# Allegro board LAY_90818_C.brd
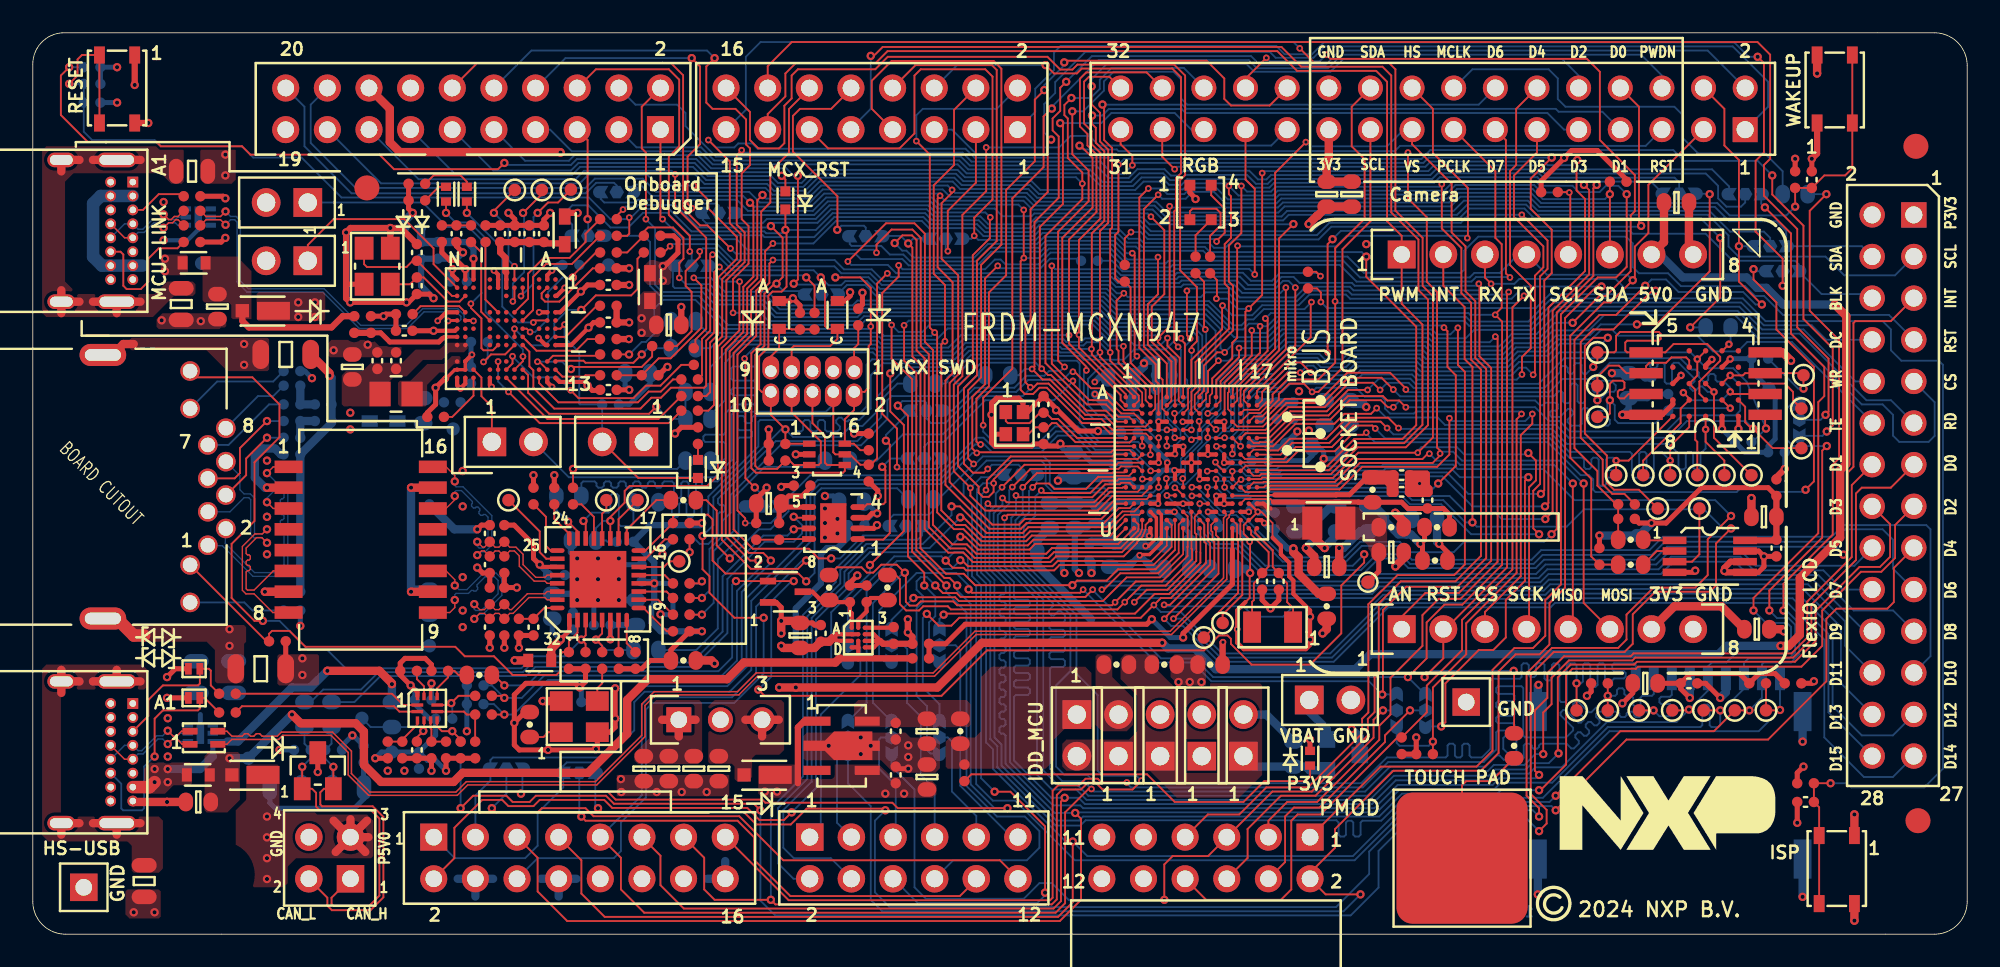
[diagram p0: board, top side]
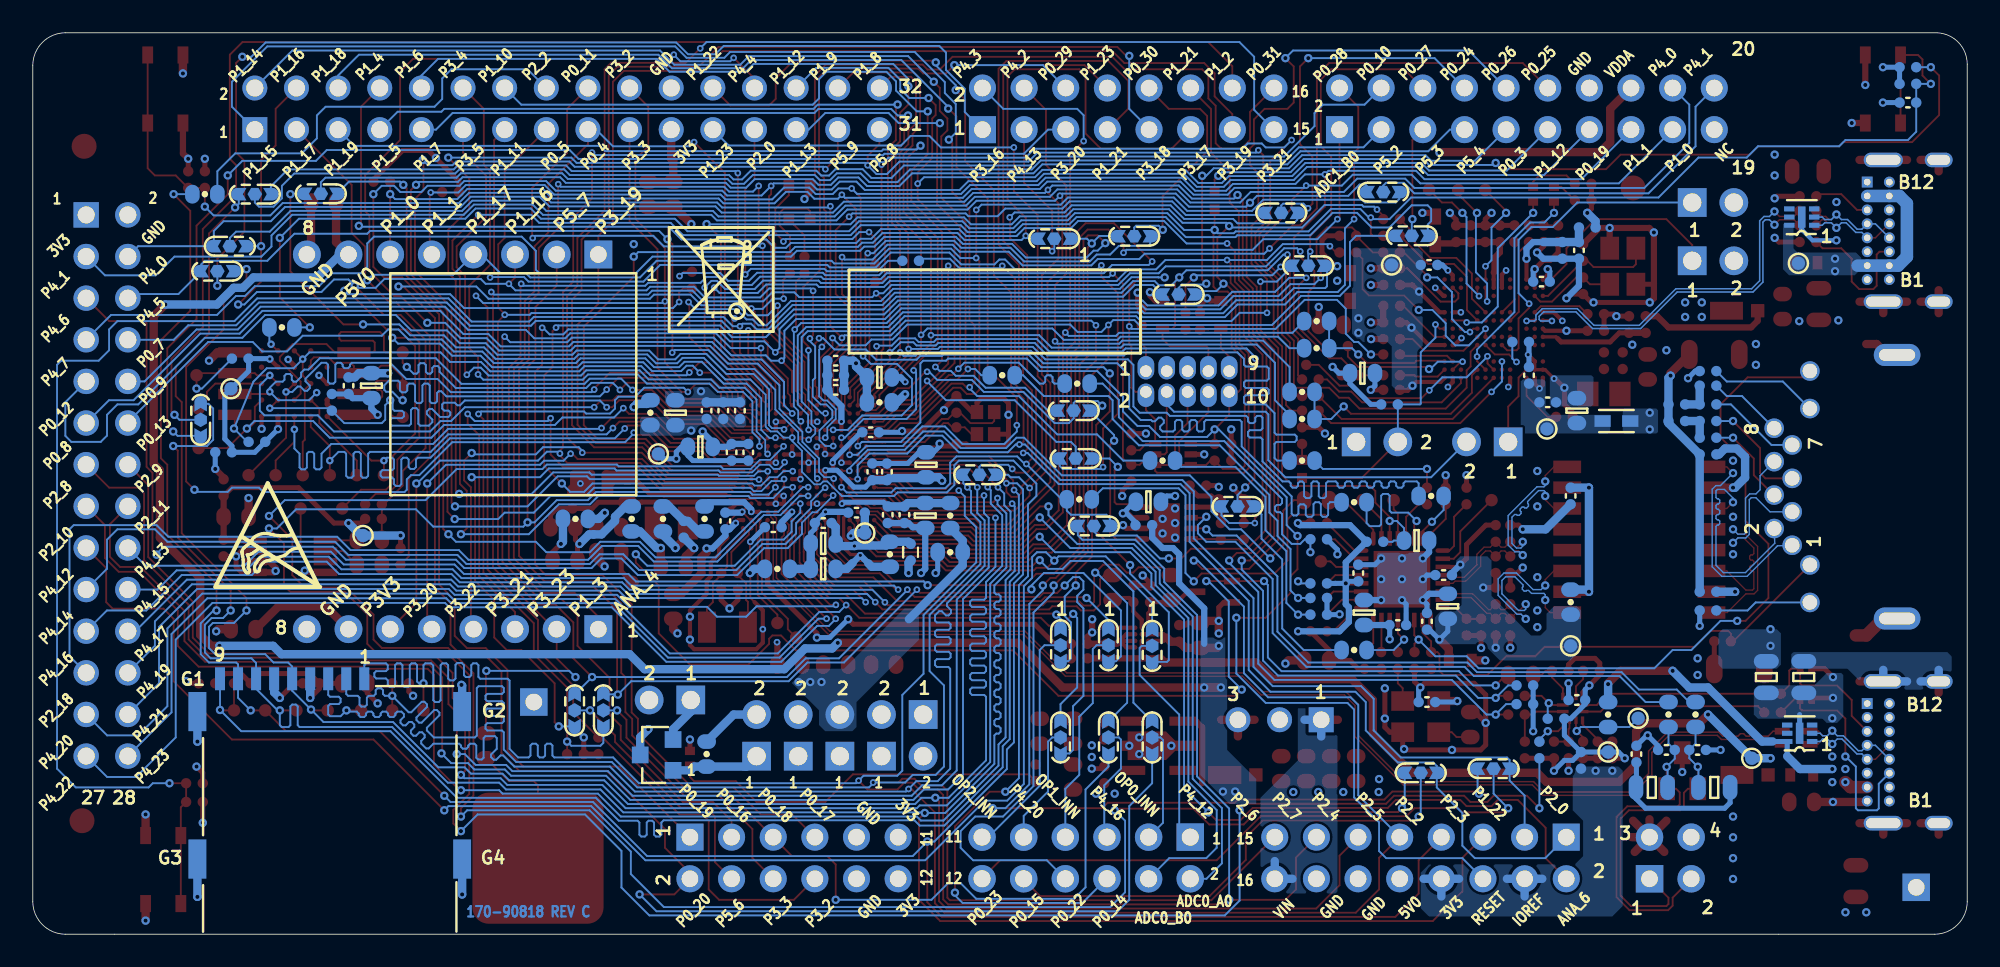
[diagram p1: board, bottom side, seen from below]

Outline 118 x 55 mm; copper layers: TOP, GND, POWER, BOTTOM. Coordinates in mm from the lower left corner of the outline.
Outline path: 0,53.08 0,2 arc(0.59,0.59) 2,0 116,0 arc(117.41,0.59) 118,2 118,53 arc(117.41,54.41) 116,55 1.84,55 arc(0.53,54.41) 0,53.08

## Design rules (mm)
constraint set DEFAULT: min track width 0.112, pair gap 0.112
net group DIFFPAIR2: nets HS_USB_DN HS_USB_DP
net group DIFFPAIR3: nets MCU_LINK_USB_DN MCU_LINK_USB_DP
net group DIFFPAIR4: nets ENET_CON_RXN ENET_CON_RXP
net group DIFFPAIR5: nets ENET_CON_TXN ENET_CON_TXP
net group DIFFPAIR6: nets LPC_USB1_DM LPC_USB1_DP
net group DIFFPAIR7: nets MCX_USB1_DM MCX_USB1_DP
net group ENET_PHYAD0: nets ENET_PHYAD0 N18326563
net group P1_6/ENET_TXD0: nets P1_6/ENET_TXD0 P1_6/SMARTDMA_LCD_D2_CAMERA_D2
net group P1_7/ENET_TXD1: nets P1_7/ENET_TXD1 P1_7/SMARTDMA_LCD_D3_CAMERA_D3
net group P1_4/ENET_TXCLK: nets N18327491 N18782104 P1_4/ENET_TXCLK
net group P1_5/ENET_TXEN: nets N18326577 P1_5/ENET_TXEN P1_5/SMARTDMA_LCD_D1_CAMERA_D1
net group P1_13/ENET_RXDV/MODE2: nets N18326622 P1_13/ENET_RXDV/MODE2 P1_13/SMARTDMA_LCD_D9
net group P1_14/ENET_RXD0/MODE0: nets N18326713 P1_14/ENET_RXD0/MODE0 P1_14/SMARTDMA_LCD_D10
net group P1_15/ENET_RXD1/MODE1: nets N18326681 P1_15/ENET_RXD1/MODE1 P1_15/SMARTDMA_LCD_D11

## Placement (name value [footprint] x y rotation side)
C1  4.7pF  [CC0402_25]  61.66 32.33 90 top
C2  4.7pF  [CC0402_25]  61.66 30.42 270 top
C3  0.1UF  [CC0402_25]  108.14 8.07 180 top
C4  0.1UF  [CC0402_25]  108.52 46.04 90 top
C5  0.1UF  [CC0402_25]  3.62 50.74 0 bottom
C6  1uF  [CC0603_OV]  78.8 31.82 90 bottom
C7  0.1UF  [CC0402_25]  76.9 31.94 90 bottom
C8  0.1UF  [CC0402_25]  75.88 31.94 90 bottom
C9  0.1UF  [CC0402_25]  74.87 31.94 90 bottom
C10  1uF  [CC0603_OV]  63.51 28.64 90 bottom
C11  0.1UF  [CC0402_25]  66.79 28.21 90 bottom
C12  0.1UF  [CC0402_25]  65.9 28.21 90 bottom
C13  1uF  [CC0603_OV]  66.36 33.98 180 bottom
C14  0.1UF  [CC0402_25]  69.02 34.1 0 bottom
C15  0.1UF  [CC0402_25]  69.02 33.21 0 bottom
C16  0.1UF  [CC0402_25]  69.02 34.99 0 bottom
C17  1uF  [CC0603_OV]  63.56 25.54 270 bottom
C18  0.1UF  [CC0402_25]  65.85 25.59 270 bottom
C19  0.1UF  [CC0402_25]  64.83 25.59 270 bottom
C20  0.1UF  [CC0402_25]  69.79 25.09 0 bottom
C21  4.7uF  [CC0603_OV]  77.28 29.74 180 bottom
C22  0.1UF  [CC0402_25]  75.37 29.4 90 bottom
C23  0.1UF  [CC0402_25]  74.36 29.4 90 bottom
C24  2.2UF  [CC0402_25]  83.5 28.01 0 top
C25  1uF  [CC0603_OV]  69.79 22.29 0 bottom
C26  0.22uF  [CC0402_25]  67.75 25.72 0 bottom
C27  6.8uF  [CC0603_OV]  82.87 23.31 0 top
C28  4.7uF  [CC0603_OV]  78.93 22.42 180 top
C29  0.1UF  [CC0402_25]  72.83 24.83 0 bottom
C30  0.1UF  [CC0402_25]  66.89 30.62 180 bottom
C31  0.1UF  [CC0402_25]  75.75 25.21 90 bottom
C32  0.1UF  [CC0402_25]  85.08 26.48 90 top
C33  4.7uF  [CC0603_OV]  54.55 9.59 90 top
C34  0.1UF  [CC0402_25]  52.64 9.72 90 top
C35  4.7uF  [CC0603_OV]  54.55 12.39 270 top
C36  0.1UF  [CC0402_25]  52.64 12.39 270 top
C37  10uF  [CC0603_OV]  46.8 18.23 90 top
C38  0.22uF  [CC0402_25]  48.07 18.36 90 top
C39  4.7uF  [CC0603_OV]  10.1 8.07 180 top
C40  0.22uF  [CC0402_25]  23.43 11.24 270 top
C41  0.22uF  [CC0402_25]  23.81 14.29 0 bottom
C42  1uF  [CC0603_OV]  98.36 15.31 180 top
C43  0.1UF  [CC0402_25]  101.03 15.31 0 top
C44  0.1UF  [CC0402_25]  106.36 23.56 270 top
C45  1uF  [CC0603_OV]  105.6 25.47 180 top
C46  1uF  [CC0603_OV]  97.34 33.47 90 bottom
C47  0.1UF  [CC0402_25]  98.74 33.47 90 bottom
C48  470pF  [CC0402_25]  34.73 18.86 180 bottom
C49  1uF  [CC0603_OV]  36.79 19.63 90 bottom
C50  22uF  [CC0603_OV]  31.69 20.01 90 bottom
C51  0.1UF  [CC0402_25]  32.96 19.09 90 bottom
C52  0.1UF  [CC0402_25]  31.94 21.91 0 bottom
C53  0.1UF  [CC0402_25]  37.15 22.04 90 bottom
C54  15pF  [CC0402_25]  27.88 22.55 270 top
C55  15pF  [CC0402_25]  27.88 24.45 90 top
C56  15pF  [CC0402_25]  27.88 18.74 270 top
C57  15pF  [CC0402_25]  27.88 20.64 90 top
C58  0.1UF  [CC0402_25]  32.96 14.16 0 bottom
C60  1000pF  [CC1206_OV]  13.91 16.2 0 top
C61  1000pF  [CC1206_OV]  15.43 35.37 180 top
C62  10uF  [CC0603_OV]  33.59 24.02 180 bottom
C63  100PF  [CC0402_25]  30.54 18.74 270 top
C64  1uF  [CC0603_OV]  44.89 26.28 180 top
C65  1uF  [CC0603_OV]  49.95 26.38 180 bottom
C66  56PF  [CC0402_25]  16.45 11.24 180 bottom
C67  0.01UF  [CC0402_25]  20.18 10.99 90 bottom
C68  56PF  [CC0402_25]  18.35 11.24 0 bottom
C69  10uF  [CC0603_OV]  69.79 23.84 0 bottom
C70  10uF  [CC0603_OV]  105.17 18.61 0 top
C71  10uF  [CC0603_OV]  100.27 44.64 0 top
C72  10uF  [CC0603_OV]  38.8 10.1 270 top
C73  10uF  [CC0603_OV]  40.32 10.1 270 top
C74  10uF  [CC0603_OV]  37.27 10.1 270 top
C75  10uF  [CC0603_OV]  41.85 10.1 270 top
C76  0.1UF  [CC0402_25]  35.11 39.61 0 top
C77  0.1UF  [CC0402_25]  35.11 33.21 0 top
C78  4.7uF  [CC0603_OV]  11.26 38.29 270 top
C79  0.1UF  [CC0402_25]  22.66 36.82 180 top
C80  0.1UF  [CC0402_25]  35.11 37.33 0 top
C81  0.1UF  [CC0402_25]  25.97 39.82 180 bottom
C82  0.1UF  [CC0402_25]  32.83 40.83 180 bottom
C83  10uF  [CC0603_OV]  36.89 34.23 180 bottom
C84  10uF  [CC0603_OV]  38.8 37.18 0 top
C85  0.1UF  [CC0402_25]  25.84 42.74 270 top
C86  0.1UF  [CC0402_25]  30.29 42.74 90 top
C87  47PF  [CC0402_25]  29.4 42.74 90 top
C88  0.1UF  [CC0402_25]  28.51 42.74 90 top
C89  47PF  [CC0402_25]  31.18 42.74 90 top
C90  22uF  [CC0603_OV]  19.49 34.61 90 top
C91  0.1UF  [CC0402_25]  21.02 34.99 90 top
C92  47PF  [CC0402_25]  22.16 34.99 90 top
C93  22uF  [CC0603_OV]  23.81 31.94 90 bottom
C94  0.1UF  [CC0402_25]  26.73 34.1 90 bottom
C95  47PF  [CC0402_25]  25.59 32.45 180 bottom
C96  12PF  [CC0402_25]  23.43 39.56 270 top
C97  12PF  [CC0402_25]  23.43 41.6 90 top
C99  0.1UF  [CC0402_25]  24.19 26.74 270 bottom
C100  4.7pF  [CC0402_25]  74.99 21.53 270 top
C101  4.7pF  [CC0402_25]  76.01 21.53 270 top
C102  0.01UF  [CC0805_OV]  6.79 3.24 90 top
C103  0.01UF  [CC0805_OV]  9.05 38.45 90 top
C104  10uF  [CC0603_OV]  78.93 45.15 270 top
C105  10uF  [CC0603_OV]  80.45 45.15 270 top
C106  0.1UF  [CC0402_25]  23.68 41.72 270 bottom
C107  0.1UF  [CC0402_25]  83.5 26.99 0 top
D1  RED LED  [LED_1P1_1P1X0P6_SM]  45.91 44.77 90 top
D2  RGB  [LED4_2P7X2P6_SM]  71.23 44.64 270 top
D3  MSS1P3L  [SMB_2P7X1P4]  14.03 38.04 180 top
D4  MSS1P3L  [SMB_2P7X1P4]  13.4 9.72 180 top
D5  YEL-GRN  [LED_1X0P6_SM]  77.91 10.74 270 top
D6  MSS1P3L  [SMB_2P7X1P4]  44.64 9.72 180 top
D7  PESD5V0F1BL  [SOD882]  9.84 14.42 0 top
D8  PESD5V0F1BL  [SOD882]  9.84 16.2 0 top
D9  NUP2105L  [SOT-23]  17.38 9.97 0 top
D10  YEL-GRN  [LED_1X0P6_SM]  25.21 45.15 90 top
D11  RED LED  [LED_1P1_1P1X0P6_SM]  40.58 28.39 90 top
D12  YEL-GRN  [LED_1X0P6_SM]  26.48 45.15 90 top
D14  PESD3V3S1UB  [SOD523]  45.53 37.79 90 top
D15  PESD3V3S1UB  [SOD523]  49.08 37.79 90 top
D16  PESD3V3L5UY  [SOT-363_0P65_SMT]  48.45 29.28 0 top
D17  BAT54C-7-F  [SOT23-40X40]  79.95 10.94 90 bottom
E1  Electrode_8mm*8mm  [ELECTRODE_8MM_SQ_CIR]  87.18 4.64 0 top
J1  CON 2x8  [CON_2X8_SKT_100_TH]  60.07 49.09 180 top
J2  CON 2x10  [CON_SKT2X10_TH]  38.29 49.09 270 top
J3  CON 2x8  [CON_2X8_SKT_100_TH]  24.46 5.92 0 top
J4  CON 2x6  [CON_SKT2X6_TH_126L]  47.39 5.92 180 top
J5  SKT_1X8  [CON_1X8_SKT_2P54_TH_126L]  83.5 41.47 90 top
J6  SKT_1X8  [CON_1X8_SKT_2P54_TH_126L]  83.5 18.61 90 top
J7  PPPC062LJBN-RC  [SKT2X6_100_TH_RA]  77.91 5.92 270 top
J8  CON 2x14  [CON_SKT2X14_TH_126L]  114.74 43.89 0 top
J9  CON 2x16  [CON_SKT_32F_100_TH]  104.46 49.09 270 top
J10  HDR 2X2  [HDR202_100_TH]  19.38 3.38 180 top
J11  USB_TYPE_C  [CON16_USB_TYPE-C_RA_TH]  6.1 14.08 270 top
J12  CON_SD_CARD_9  [CON9_SDCARD_1P1_15P05X14P75_SM]  99.88 7.56 180 bottom
J15  HDR_1X3  [HDR103]  39.41 13.09 90 top
J16  RJ45X2_LEDYG  [CON12P_1P02_16P48X15P5_RA_TH]  10.68 23.73 270 top
J17  USB_TYPE_C  [CON16_USB_TYPE-C_RA_TH]  6.1 45.89 270 top
J18  HDR1X2  [HDR1X2_5P48X2P69]  16.78 44.64 180 top
J19  HDR1X2  [HDR1X2_5P48X2P69]  16.78 41.09 180 top
J21  HDR1X2  [HDR1X2_5P48X2P69]  37.27 30.04 180 top
J22  HDR1X2  [HDR1X2_5P48X2P69]  28 30.04 0 top
J23  HDR 2X5  [HDR_5X2_FTSH_TH]  50.1 34.36 270 top
J24  HDR1X2  [HDR1X2_5P48X2P69]  63.69 13.4 270 top
J25  HDR1X2  [HDR1X2_5P48X2P69]  68.77 10.86 90 top
J26  HDR1X2  [HDR1X2_5P48X2P69]  66.23 10.86 90 top
J27  HDR1X2  [HDR1X2_5P48X2P69]  71.31 10.86 90 top
J28  HDR1X2  [HDR1X2_5P48X2P69]  73.85 10.86 90 top
JP1  HDR 1X1  [HDR101]  3.11 2.86 90 top
JP2  HDR 1X1  [HDR101]  87.44 14.16 90 top
JP6  HDR1X2  [HDR1X2_5P48X2P69]  77.86 14.29 0 top
L1  120 Ohm  [IND_0402]  64.45 23.31 90 bottom
L2  1.5UH  [IND_SPH2520]  79.06 25.09 0 top
L3  330 OHM  [IND_1608]  10.1 9.72 0 top
L5  100 OHM@100MHZ  [IND_1608]  30.92 16.7 0 top
L6  330 OHM  [IND_1608]  9.84 40.96 0 top
L9  600OHM  [IND_1P8X1MM_SM]  37.65 39.49 270 top
L10  600OHM  [IND_1P8X1MM_SM]  32.45 42.94 270 top
L11  4.7uH  [IND_0805]  22.16 32.96 180 top
L12  600OHM  [IND_1P8X1MM_SM]  21.4 31.31 0 bottom
L13  90OHM  [IND4_CHOKE_0805_39H]  10.44 11.99 0 top
MH1  125  [MH125-160]  115 51.99 0 top
MH2  125  [MH125-160]  115 3.01 0 top
MH3  125  [MH125-160]  11.5 3.62 0 top
MH4  125  [MH125-160]  10.29 50.56 0 top
NOREF  -  []  27 3.38 0 top
NOREF#2  -  []  98.21 24.13 0 top
NOREF#3  -  []  32.9 42.61 0 top
NOREF#4  -  []  7.74 53.73 90 top
NOREF#5  -  []  63.52 10.58 0 top
NOREF#6  -  []  3.87 28.39 0 top
NOREF#7  -  []  5.72 14.58 90 top
NOREF#8  -  []  42.29 49.09 90 top
NOREF#9  -  []  9.6 22.53 90 top
NOREF#10  -  []  67.67 25.27 0 top
NOREF#11  -  []  24.55 17.4 0 top
NOREF#12  -  []  9.33 14.73 0 top
NOREF#13  -  []  31.29 14.54 90 top
NOREF#14  -  []  80.2 29.11 0 top
NOREF#15  -  []  18.25 36.95 90 top
NOREF#16  -  []  55.31 16.65 90 top
NOREF#17  -  []  65.07 1.88 0 top
NOREF#18  -  []  26 30.64 0 top
NOREF#19  -  []  40.88 27.84 0 top
NOREF#20  -  []  23.46 13.58 0 top
NOREF#21  -  []  4.28 19.26 90 top
NOREF#22  -  []  94.89 -5.41 90 top
NOREF#23  -  []  40.88 28.94 90 top
NOREF#24  -  []  83.2 13.66 90 top
NOREF#25  -  []  97.78 15.59 0 top
NOREF#26  -  []  49.83 42.59 0 top
NOREF#27  -  []  1.74 38.59 90 top
NOREF#28  -  []  16.43 30.6 90 top
NOREF#29  -  []  46.21 43.12 90 top
NOREF#30  -  []  52.39 16.65 90 top
NOREF#31  -  []  42.29 51.63 0 top
NOREF#32  -  []  60.26 28.03 0 top
NOREF#33  -  []  25.53 44.63 0 top
NOREF#34  -  []  77.91 10.29 90 top
NOREF#35  -  []  4.28 19.26 90 top
NOREF#36  -  []  34.73 30.04 0 top
NOREF#37  -  []  102.81 4.16 0 top
NOREF#38  -  []  96.96 4.16 0 top
NOREF#39  -  []  25.53 44.63 90 top
NOREF#40  -  []  95.91 28.74 0 top
NOREF#41  -  []  53.53 31.94 0 top
NOREF#42  -  []  112.64 6.1 90 top
NOREF#43  -  []  11.65 3.56 90 top
NOREF#44  -  []  9.28 17.55 0 top
NOREF#45  -  []  77.86 14.29 0 top
NOREF#46  -  []  98.41 31.69 90 top
NOREF#47  -  []  1.74 38.59 0 top
NOREF#48  -  []  93.15 5.15 0 top
NOREF#49  -  []  47.84 10 0 top
NOREF#50  -  []  76.39 12.95 0 top
NOREF#51  -  []  10.68 23.73 0 top
NOREF#52  -  []  68.21 35.45 0 top
NOREF#53  -  []  35.73 19.17 0 top
NOREF#54  -  []  77.59 11.26 0 top
NOREF#55  -  []  32.95 43.84 90 top
NOREF#56  -  []  98.41 34.23 90 top
NOREF#57  -  []  4.07 49.49 0 top
NOREF#58  -  []  107.43 0.16 90 top
NOREF#59  -  []  32.73 19.17 90 top
NOREF#60  -  []  40.19 40.78 0 top
NOREF#61  -  []  40.87 44.01 0 top
NOREF#62  -  []  95.9 28.76 90 top
NOREF#63  -  []  103.48 45.15 0 top
NOREF#64  -  []  20.55 31.31 0 top
NOREF#65  -  []  55.69 42.44 0 top
NOREF#66  -  []  99.45 45.18 0 top
NOREF#67  -  []  75.19 9.39 90 top
NOREF#68  -  []  65.21 3.38 90 top
NOREF#69  -  []  106.74 40.45 0 top
NOREF#70  -  []  1.74 6.78 90 top
NOREF#71  -  []  15.6 19.63 90 top
NOREF#72  -  []  66.23 10.86 90 top
NOREF#73  -  []  44.51 26.1 0 top
NOREF#74  -  []  10.68 23.73 0 top
NOREF#75  -  []  105 41.98 0 top
NOREF#76  -  []  97.78 15.59 0 top
NOREF#77  -  []  107.96 4.59 90 top
NOREF#78  -  []  47.13 39.03 0 top
NOREF#79  -  []  105.76 40.45 0 top
NOREF#80  -  []  55.31 11.03 90 top
NOREF#81  -  []  64.71 52.99 0 top
NOREF#82  -  []  3.11 2.86 0 top
NOREF#83  -  []  108.84 53.65 0 top
NOREF#84  -  []  -262.98 261.03 0 top
NOREF#85  -  []  48.28 17.26 0 top
NOREF#86  -  []  97.19 -36.41 0 top
NOREF#87  -  []  24.27 13.06 0 top
NOREF#88  -  []  73.85 10.86 90 top
NOREF#89  -  []  50.75 17.5 90 top
NOREF#90  -  []  6.1 13.23 90 top
NOREF#91  -  []  92.77 1.85 0 top
NOREF#92  -  []  -2.5 -180.55 0 top
NOREF#93  -  []  92.33 0.16 90 top
NOREF#94  -  []  61.71 42.51 0 top
NOREF#95  -  []  32.45 42.1 90 top
NOREF#96  -  []  68.77 10.86 90 top
NOREF#97  -  []  66.67 24.77 0 top
NOREF#98  -  []  20.5 30.81 0 top
NOREF#99  -  []  39.22 40.78 0 top
NOREF#100  -  []  3.11 2.86 0 top
NOREF#101  -  []  91.81 13.59 0 top
NOREF#102  -  [unnamed#2]  114.87 48.07 0 top
NOREF#103  -  []  94.89 -2.31 90 top
NOREF#104  -  []  67.6 24.67 0 top
NOREF#105  -  []  104.43 0.18 90 top
NOREF#106  -  []  54.38 29.02 0 top
NOREF#107  -  []  25.21 44.7 90 top
NOREF#108  -  []  104.46 45.15 0 top
NOREF#109  -  []  26.8 44.63 0 top
NOREF#110  -  []  50.75 17.5 90 top
NOREF#111  -  []  18.25 36.95 0 top
NOREF#112  -  []  31.29 14.54 0 top
NOREF#113  -  []  55.31 11.03 90 top
NOREF#114  -  []  20.44 12.98 0 top
NOREF#115  -  []  24.67 13.58 90 top
NOREF#116  -  []  54.71 42.44 0 top
NOREF#117  -  []  33.88 42.61 0 top
NOREF#118  -  []  40.87 44.01 0 top
NOREF#119  -  []  116 0 90 top
NOREF#120  -  []  108.97 1.87 90 top
NOREF#121  -  []  83.18 1.64 0 top
NOREF#122  -  []  49.72 11.03 90 top
NOREF#123  -  []  103.76 4.16 0 top
NOREF#124  -  []  26.53 28.69 90 top
NOREF#125  -  []  70.11 9.39 90 top
NOREF#126  -  []  103.76 4.16 90 top
NOREF#127  -  []  53.4 29.02 0 top
NOREF#128  -  []  9.49 16.2 0 top
NOREF#129  -  []  72.5 14.87 0 top
NOREF#130  -  []  6.49 47.49 90 top
NOREF#131  -  []  115.72 49.41 90 top
NOREF#132  -  []  34.64 45.28 0 top
NOREF#133  -  []  24.89 12.96 0 top
NOREF#134  -  []  54.51 31.94 0 top
NOREF#135  -  []  14.24 44.64 0 top
NOREF#136  -  []  35.47 40.64 0 top
NOREF#137  -  []  94.89 -1.21 90 top
NOREF#138  -  []  38.15 40.39 0 top
NOREF#139  -  []  14.24 41.09 0 top
NOREF#140  -  []  4.07 49.49 90 top
NOREF#141  -  []  92.33 0.16 0 top
NOREF#142  -  []  9.95 14.73 90 top
NOREF#143  -  []  43.53 26.1 0 top
NOREF#144  -  []  70.58 43.6 0 top
NOREF#145  -  []  9.6 20.24 90 top
NOREF#146  -  []  49.95 17.5 0 top
NOREF#147  -  []  26.8 44.63 90 top
NOREF#148  -  []  111.55 50.78 0 top
NOREF#149  -  []  24.66 13.06 90 top
NOREF#150  -  []  48.04 9.2 0 top
NOREF#151  -  []  62.34 9.39 90 top
NOREF#152  -  []  9.6 22.53 90 top
NOREF#153  -  []  34.64 45.28 0 top
NOREF#154  -  []  81.87 12.95 90 top
NOREF#155  -  []  45.91 44.22 90 top
NOREF#156  -  []  49.72 11.03 90 top
NOREF#157  -  []  32.36 9.85 0 top
NOREF#158  -  []  106.58 15.59 0 top
NOREF#159  -  []  108.97 1.87 0 top
NOREF#160  -  []  98.41 35.5 0 top
NOREF#161  -  []  49.72 16.62 90 top
NOREF#162  -  []  4.28 19.26 90 top
NOREF#163  -  []  20.5 30.81 90 top
NOREF#164  -  []  31.99 23.41 0 top
NOREF#165  -  []  74.67 24.77 90 top
NOREF#166  -  []  22.27 10.93 0 top
NOREF#167  -  []  37.65 38.64 90 top
NOREF#168  -  []  23.84 34.17 0 top
NOREF#169  -  []  52.3 24.91 0 top
NOREF#170  -  []  31.15 43.84 0 top
NOREF#171  -  []  81.8 21.29 0 top
NOREF#172  -  []  48.28 15.58 90 top
NOREF#173  -  []  105 41.98 0 top
NOREF#174  -  []  147.16 45.53 90 top
NOREF#175  -  []  106.1 47.74 0 top
NOREF#176  -  []  24.46 3.38 0 top
NOREF#177  -  []  49.72 16.62 90 top
NOREF#178  -  []  9.95 16.51 90 top
NOREF#179  -  []  95.9 28.76 90 top
NOREF#180  -  []  53.28 24.91 0 top
NOREF#181  -  []  4.75 8.13 0 top
NOREF#182  -  []  13.5 10.55 0 top
NOREF#183  -  []  90.18 0.64 90 top
NOREF#184  -  []  40.58 27.84 90 top
NOREF#185  -  []  114.74 41.35 90 top
NOREF#186  -  []  1.74 6.78 0 top
NOREF#187  -  []  6.1 45.04 90 top
NOREF#188  -  []  38.15 39.39 90 top
NOREF#189  -  []  0 53.08 0 top
NOREF#190  -  []  64.88 14.87 0 top
NOREF#191  -  []  47.84 13 0 top
NOREF#192  -  []  111.52 49.41 0 top
NOREF#193  -  []  26.48 44.7 90 top
NOREF#194  -  []  69.96 14.87 0 top
NOREF#195  -  []  46.21 45.32 0 top
NOREF#196  -  []  67.28 45.99 0 top
NOREF#197  -  []  10.66 40.75 0 top
NOREF#198  -  []  -2.66 47.49 0 top
NOREF#199  -  []  91.81 13.59 90 top
NOREF#200  -  []  28 30.04 0 top
NOREF#201  -  []  75.37 5.92 0 top
NOREF#202  -  []  27.91 10.1 0 top
NOREF#203  -  []  62.34 9.39 0 top
NOREF#204  -  []  59.28 28.03 0 top
NOREF#205  -  []  74.17 27.27 90 top
NOREF#206  -  [unnamed#2]  20.38 45.53 0 top
NOREF#207  -  []  82.78 42.51 90 top
NOREF#208  -  []  48.04 9.2 90 top
NOREF#209  -  []  42.24 3.38 90 top
NOREF#210  -  []  52.39 11.03 90 top
NOREF#211  -  []  3.11 2.86 0 top
NOREF#212  -  []  50.81 42.59 0 top
NOREF#213  -  []  67.57 9.39 90 top
NOREF#214  -  []  49.95 17.5 0 top
NOREF#215  -  []  -2.66 15.68 0 top
NOREF#216  -  []  96.96 4.16 0 top
NOREF#217  -  []  100.43 45.18 0 top
NOREF#218  -  []  15.6 19.63 0 top
NOREF#219  -  []  91.81 4.59 0 top
NOREF#220  -  []  77.59 10.21 90 top
NOREF#221  -  []  4.75 39.94 0 top
NOREF#222  -  []  54.99 51.63 0 top
NOREF#223  -  []  34.44 12.33 90 top
NOREF#224  -  []  52.39 16.65 90 top
NOREF#225  -  []  17.58 -13.8 90 top
NOREF#226  -  []  84.95 12.68 90 top
NOREF#227  -  []  107.96 13.59 90 top
NOREF#228  -  []  9.49 14.42 0 top
NOREF#229  -  []  63.52 1.88 90 top
NOREF#230  -  []  9.33 16.51 0 top
NOREF#231  -  []  52.39 11.03 90 top
NOREF#232  -  []  15.6 27.25 90 top
NOREF#233  -  []  63.69 10.86 90 top
NOREF#234  -  []  66.36 51.63 0 top
NOREF#235  -  []  72.65 9.39 90 top
NOREF#236  -  []  84.95 13.66 90 top
NOREF#237  -  []  107.76 31.39 90 top
NOREF#238  -  []  55.31 16.65 90 top
NOREF#239  -  []  71.31 10.86 90 top
NOREF#240  -  []  95.91 28.74 0 top
NOREF#241  -  []  44.22 31.39 90 top
NOREF#242  -  []  110.99 49.49 90 top
NOREF#243  -  []  27.91 10.1 0 top
NOREF#244  -  []  24.89 12.96 90 top
NOREF#245  -  []  17.58 -13.8 0 top
NOREF#246  -  []  18.25 40.51 90 top
NOREF#247  -  []  96.96 4.16 90 top
NOREF#248  -  []  -20.33 19.06 0 top
NOREF#249  -  []  57.17 33.27 0 top
NOREF#250  -  []  98.41 35.5 0 top
NOREF#251  -  []  91.81 4.59 90 top
NOREF#252  -  []  -287.62 -260.56 0 top
NOREF#253  -  []  108.44 6.1 0 top
NOREF#254  -  []  48.11 39.03 0 top
NOREF#255  -  []  6.49 15.68 90 top
NOREF#256  -  []  31.99 19.91 90 top
NOREF#257  -  []  83.4 1.01 0 top
NOREF#258  -  []  67.28 43.49 90 top
NOREF#259  -  []  83.2 12.68 90 top
NOREF#260  -  []  97.78 15.59 0 top
NOREF#261  -  []  18.25 40.51 0 top
NOREF#262  -  []  4.28 19.26 90 top
NOREF#263  -  []  67.42 14.87 0 top
NOREF#264  -  []  107.76 30.41 90 top
NOREF#265  -  []  114.74 10.87 90 top
NOREF#266  -  [unnamed#2]  115 6.93 0 top
NOREF#267  -  []  32.36 9.85 0 top
NOREF#268  -  []  106.27 33.09 0 top
NOREF#269  -  []  3.54 53.73 0 top
NOREF#270  -  []  98.41 31.69 90 top
NOREF#271  -  []  66.17 24.27 90 top
NOREF#272  -  []  38.74 31.39 0 top
NOREF#273  -  []  71.88 43.6 90 top
NOREF#274  -  []  98.41 34.23 90 top
NOREF#275  -  []  106.84 21.19 180 bottom
NOREF#276  -  []  68.21 35.45 180 bottom
NOREF#277  -  []  79.18 36.77 180 bottom
Q1  2SK3018  [SOT323_3]  45.91 20.9 270 top
R1  10K  [RC0402_25]  108.14 9.21 0 top
R2  10K  [RC0402_25]  107.5 46.04 270 top
R3  10K  [RC0402_25]  3.62 51.88 180 bottom
R4  470  [RC0402_25]  3.62 52.9 180 bottom
R5  470  [RC0402_25]  71.82 40.83 270 top
R6  470  [RC0402_25]  70.93 40.83 270 top
R7  470  [RC0402_25]  66.61 40.33 270 top
R8  0  [RC0603_OV]  62.04 25.54 90 bottom
R9  0  [RC0603_OV]  80.33 31.82 270 bottom
R10  0  [RC0603_OV]  62.04 23.31 0 bottom
R11  0  [RC0603_OV]  66.36 32.45 0 bottom
R12  0  [RC0603_OV]  72.58 22.29 180 bottom
R14  0  [RC0603_OV]  81.47 25.34 270 bottom
R15  0  [RC0603_OV]  78.93 20.01 90 top
R16  0  [RC0603_OV]  76.9 10.99 90 bottom
R17  0  [RC0603_OV]  79.56 25.34 90 bottom
R18  0  [RC0603_OV]  82.87 24.83 0 top
R19  0  [RC0603_OV]  84.9 25.34 180 bottom
R20  0  [RC0603_OV]  85.53 22.8 0 top
R21  10K  [RC0402_25]  78.29 24.71 270 bottom
R22  0  [RC0603_OV]  85.66 24.83 0 top
R23  0  [RC0603_OV]  81.72 27.12 90 top
R24  470  [RC0402_25]  56.83 9.85 270 top
R25  0  [RC0603_OV]  56.58 12.39 270 top
R26  10K  [RC0402_25]  50.86 20.77 270 top
R27  0  [RC0402_25]  54.16 16.83 0 top
R28  0  [RC0603_OV]  52.13 21.15 270 top
R29  20K  [RC0402_25]  54.16 17.72 180 top
R32  4.7K  [RC0402_25]  49.85 20.77 270 top
R33  100K  [RC0402_25]  52.51 18.23 270 top
R34  0  [RC0603_OV]  48.58 21.15 270 top
R35  0  [RC0603_OV]  21.91 13.4 270 bottom
R36  10K  [RC0402_25]  26.1 11.24 90 top
R37  10K  [RC0402_25]  25.08 13.15 0 bottom
R38  10K  [RC0402_25]  26.99 11.24 90 top
R39  10K  [RC0402_25]  24.83 16.07 0 top
R40  10K  [RC0402_25]  25.21 11.24 90 top
R41  10K  [RC0402_25]  22.92 16.07 0 top
R42  10K  [RC0402_25]  21.65 11.24 90 top
R43  0  [RC0402_25]  27.49 14.55 180 top
R44  0  [RC0603_OV]  27.24 15.82 0 top
R45  0  [RC0402_25]  27.49 13.4 180 top
R46  0  [RC0402_25]  26.1 11.24 90 bottom
R47  0  [RC0402_25]  11.87 13.53 0 top
R48  0  [RC0402_25]  11.87 14.67 0 top
R49  10K  [RC0402_25]  24.32 11.24 270 top
R50  10K  [RC0402_25]  22.54 11.24 270 top
R51  4.7K  [RC0402_25]  95.57 23.05 90 top
R52  4.7K  [RC0402_25]  97.22 25.34 0 top
R53  1.0K  [RC0402_25]  97.22 26.23 180 top
R54  100K  [RC0402_25]  95.57 15.31 180 top
R55  0  [RC0603_OV]  97.47 24.07 0 top
R56  0  [RC0603_OV]  97.47 22.55 0 top
R57  10K  [RC0402_25]  105.22 15.31 0 top
R58  10K  [RC0402_25]  104.33 30.04 0 bottom
R59  10K  [RC0402_25]  105.35 35.12 0 bottom
R60  10K  [RC0402_25]  99.76 32.45 270 bottom
R61  0  [RC0603_OV]  102.81 37.02 0 bottom
R62  49.9  [RC0402_25]  28.76 22.55 90 top
R63  49.9  [RC0402_25]  28.76 24.45 270 top
R64  49.9  [RC0402_25]  28.76 18.74 90 top
R65  49.9  [RC0402_25]  28.76 20.64 270 top
R66  470  [RC0402_25]  15.81 34.36 0 bottom
R67  4.7K  [RC0402_25]  31.81 26.74 90 top
R68  4.7K  [RC0402_25]  30.54 26.74 90 top
R69  470  [RC0402_25]  15.81 19.75 0 bottom
R70  33  [RC0402_25]  39.56 21.4 180 top
R71  33  [RC0402_25]  32.96 26.74 270 top
R72  75  [RC0402_25]  15.81 29.28 0 bottom
R73  49.9  [RC0402_25]  15.81 30.29 0 bottom
R74  75  [RC0402_25]  15.81 20.9 0 bottom
R75  33  [RC0402_25]  39.56 24.1 180 top
R76  49.9  [RC0402_25]  15.81 33.47 0 bottom
R77  49.9  [RC0402_25]  15.81 32.33 0 bottom
R78  49.9  [RC0402_25]  15.81 31.31 0 bottom
R79  33  [RC0402_25]  39.56 20.51 180 top
R80  33  [RC0402_25]  39.56 19.5 180 top
R81  33  [RC0402_25]  34.73 16.7 270 top
R82  1.0M  [RC0805_OV]  12.25 15.69 270 bottom
R83  49.9  [RC0402_25]  17.72 32.33 0 bottom
R84  49.9  [RC0402_25]  17.72 31.31 0 bottom
R85  0  [RC0603_OV]  37.4 17.34 0 bottom
R86  10K  [RC0402_25]  36.13 23.94 180 bottom
R87  12.1K  [RC0402_25]  29.65 18.74 270 top
R88  4.7K  [RC0402_25]  39.56 20.51 180 bottom
R89  4.7K  [RC0402_25]  39.56 24.1 180 bottom
R90  4.7K  [RC0402_25]  39.56 19.5 180 bottom
R91  4.7K  [RC0402_25]  39.56 21.4 0 bottom
R92  4.7K  [RC0402_25]  36.77 16.7 90 top
R93  4.7K  [RC0402_25]  35.75 16.7 90 top
R94  4.7K  [RC0402_25]  39.56 18.48 180 top
R95  4.7K  [RC0402_25]  33.72 16.7 90 top
R96  4.7K  [RC0402_25]  32.7 16.7 90 top
R97  10K  [RC0402_25]  45.53 24.58 270 top
R98  62  [RC0805_OV]  15.43 8.96 180 bottom
R100  0  [RC0603_OV]  16.57 13.4 270 bottom
R101  0  [RC0603_OV]  18.22 13.4 270 bottom
R102  62  [RC0805_OV]  19.24 8.96 180 bottom
R103  100K  [RC0402_25]  44.13 24.58 90 top
R106  10K  [RC0402_25]  19.61 37.2 270 top
R107  20K  [RC0402_25]  20.63 37.2 90 top
R108  470  [RC0402_25]  23.43 44.77 0 top
R109  470  [RC0402_25]  40.58 30.42 270 top
R110  0  [RC0402_25]  9.71 43.25 0 top
R111  0  [RC0402_25]  9.71 44.14 0 top
R112  5.1K  [RC0402_25]  9.71 45.03 0 top
R113  5.1K  [RC0402_25]  9.71 42.23 0 top
R114  470  [RC0402_25]  23.43 45.79 0 top
R116  10K  [RC0402_25]  24.95 42.74 90 top
R117  1.0K  [RC0402_25]  24.57 31.56 180 top
R118  1.0K  [RC0402_25]  35.11 36.31 0 top
R119  1.0K  [RC0402_25]  35.11 38.34 0 top
R120  1.0K  [RC0402_25]  35.11 40.63 0 top
R121  1.0K  [RC0402_25]  27.24 36.14 180 bottom
R122  1.0K  [RC0402_25]  22.66 37.84 180 top
R123  1.0K  [RC0402_25]  27.62 42.74 90 top
R124  100K  [RC0402_25]  35.24 32.33 180 bottom
R129  0  [RC0402_25]  35.11 35.37 0 top
R130  0  [RC0402_25]  37.78 41.6 0 top
R131  0  [RC0402_25]  35.11 43.63 0 top
R132  0  [RC0402_25]  35.11 42.61 0 top
R133  0  [RC0402_25]  40.07 33.85 0 top
R134  2.0K  [RC0402_25]  47.69 37.41 270 top
R135  2.2K  [RC0402_25]  46.8 37.41 90 top
R136  0  [RC0402_25]  38.29 35.88 0 top
R137  0  [RC0402_25]  40.32 35.25 90 top
R138  0  [RC0402_25]  40.07 31.94 0 top
R139  0  [RC0402_25]  40.07 32.83 0 top
R140  2.2K  [RC0402_25]  37.65 34.1 180 top
R141  2.2K  [RC0402_25]  37.78 42.61 180 top
R142  0  [RC0402_25]  35.11 41.6 0 top
R143  0  [RC0402_25]  35.11 34.1 0 top
R144  100K  [RC0402_25]  50.99 30.04 270 top
R145  100K  [RC0402_25]  45.4 28.9 0 top
R146  100K  [RC0402_25]  45.4 29.91 0 top
R147  100K  [RC0402_25]  50.99 28.13 270 top
R148  4.7K  [RC0402_25]  26.99 14.04 0 bottom
R149  4.7K  [RC0402_25]  26.99 15.18 0 bottom
R151  0  [RC0603_OV]  69.02 16.45 0 top
R152  0  [RC0603_OV]  66.1 16.45 180 top
R153  0  [RC0603_OV]  24.19 20.26 90 bottom
R154  0  [RC0603_OV]  30.31 12.79 90 top
R155  1.5K  [RC0402_25]  39.56 25.09 180 top
R156  0  [RC0603_OV]  90.36 11.5 90 top
R160  0  [RC0603_OV]  40.58 28.9 0 bottom
R161  0  [RC0603_OV]  37.4 26.36 0 bottom
R162  0  [RC0603_OV]  32.7 26.74 0 bottom
R163  0  [RC0603_OV]  54.29 33.6 0 bottom
R164  0  [RC0603_OV]  58.86 34.1 0 bottom
R165  0  [RC0603_OV]  49.08 28.9 0 bottom
R166  0  [RC0603_OV]  54.16 26.53 0 bottom
R167  0  [RC0402_25]  64.45 41.09 180 bottom
R168  0  [RC0603_OV]  107.5 45.15 0 bottom
R169  0  [RC0402_25]  77.79 39.91 90 top
R171  0  [RC0603_OV]  65.72 23.18 270 bottom
R172  330  [RC0603_OV]  40.58 31.44 0 bottom
R173  330  [RC0603_OV]  39.69 35.75 0 bottom
R178  330  [RC0603_OV]  40.58 33.09 0 bottom
R179  330  [RC0603_OV]  39.69 37.41 0 bottom
R188  100  [RC0402_25]  50.35 37.66 270 top
R189  100  [RC0402_25]  26.73 42.74 90 top
R190  0  [RC0603_OV]  39.69 16.7 0 top
R191  0  [RC0603_OV]  39.69 26.48 180 top
R192  0  [RC0805_OV]  9.97 15.69 90 bottom
R193  0  [RC0805_OV]  9.71 46.55 180 top
R194  0  [RC0603_OV]  77.02 25.34 270 bottom
R198  0  [RC0402_25]  46.93 27.37 0 top
R199  0  [RC0402_25]  50.23 24.96 0 bottom
R200  0  [RC0402_25]  106.36 29.4 180 bottom
R201  0  [RC0402_25]  106.36 27.25 270 top
R202  0  [RC0402_25]  107.38 15.31 180 top
R203  0  [RC0402_25]  23.56 10.61 90 bottom
R204  2.0K  [RC0402_25]  23.18 43.12 0 bottom
R205  2.0K  [RC0402_25]  24.7 41.72 270 bottom
R207  10K  [RC0402_25]  14.92 17.87 0 top
R208  4.7K  [RC0402_25]  92.52 45.28 0 top
R209  4.7K  [RC0402_25]  96.71 45.91 180 top
R210  4.7K  [RC0402_25]  83.5 11.5 90 top
R211  4.7K  [RC0402_25]  84.9 10.99 0 top
R212  0  [RC0603_OV]  71.82 16.45 0 top
SJ1  3 PIN 0402 JUMPER  [3PIN_0402X2_A]  60.26 28.03 180 bottom
SJ2  3 PIN 0402 JUMPER  [3PIN_0402X2_A]  50.81 42.59 180 bottom
SJ3  3 PIN 0402 JUMPER  [3PIN_0402X2_A]  53.28 24.91 180 bottom
SJ4  3 PIN 0402 JUMPER  [3PIN_0402X2_A]  107.76 31.39 270 bottom
SJ5  3 PIN 0402 JUMPER  [3PIN_0402X2_A]  104.46 45.15 180 bottom
SJ6  3 PIN 0402 JUMPER  [3PIN_0402X2_A]  40.19 40.78 180 bottom
SJ7  3 PIN 0402 JUMPER  [3PIN_0402X2_A]  41.85 44.01 0 bottom
SJ8  3 PIN 0402 JUMPER  [3PIN_0402X2_A]  33.34 9.85 0 bottom
SJ9  3 PIN 0402 JUMPER  [3PIN_0402X2_A]  28.89 10.1 0 bottom
SJ10  3 PIN 0402 JUMPER  [3PIN_0402X2_A]  55.69 42.44 180 bottom
SJ11  3 PIN 0402 JUMPER  [3PIN_0402X2_A]  106.74 40.45 180 bottom
SJ12  3 PIN 0402 JUMPER  [3PIN_0402X2_A]  83.2 13.66 270 bottom
SJ13  3 PIN 0402 JUMPER  [3PIN_0402X2_A]  84.95 13.66 270 bottom
SJ14  3 PIN 0402 JUMPER  [3PIN_0402X2_A]  105.98 41.98 0 bottom
SJ15  3 PIN 0402 JUMPER  [3PIN_0402X2_A]  35.62 45.28 0 bottom
SJ16  3 PIN 0402 JUMPER  [3PIN_0402X2_A]  54.51 31.94 180 bottom
SJ17  3 PIN 0402 JUMPER  [3PIN_0402X2_A]  48.11 39.03 180 bottom
SJ18  3 PIN 0402 JUMPER  [3PIN_0402X2_A]  33.88 42.61 180 bottom
SJ19  3 PIN 0402 JUMPER  [3PIN_0402X2_A]  100.43 45.18 180 bottom
SJ20  3 PIN 0402 JUMPER  [3PIN_0402X2_A]  55.31 17.63 90 bottom
SJ21  3 PIN 0402 JUMPER  [3PIN_0402X2_A]  55.31 12.01 90 bottom
SJ22  3 PIN 0402 JUMPER  [3PIN_0402X2_A]  52.39 17.63 90 bottom
SJ23  3 PIN 0402 JUMPER  [3PIN_0402X2_A]  52.39 12.01 90 bottom
SJ24  3 PIN 0402 JUMPER  [3PIN_0402X2_A]  49.72 12.01 90 bottom
SJ25  3 PIN 0402 JUMPER  [3PIN_0402X2_A]  49.72 17.59 90 bottom
SJ26  3 PIN 0402 JUMPER  [3PIN_0402X2_A]  54.38 29.02 180 bottom
SJ27  3 PIN 0402 JUMPER  [3PIN_0402X2_A]  44.51 26.1 180 bottom
SW1  SW SPST NO  [SW4_4P15_4P2X3P2_SM]  5.14 51.63 270 top
SW2  SW SPST NO  [SW4_4P15_4P2X3P2_SM]  109.92 51.51 90 top
SW3  SW SPST NO  [SW4_4P15_4P2X3P2_SM]  110.04 4 270 top
T1  PT61018PEL  [XFMR16_1P27_13P05X7P15]  20 24.07 270 top
TP1  -  [TPAD_032]  67.25 24.48 0 bottom
TP2  -  [TPAD_030]  71.44 18.1 0 top
TP3  -  [TPAD_030]  72.58 18.99 0 top
TP4  -  [TPAD_030]  101.92 13.66 270 top
TP5  -  [TPAD_030]  103.82 13.66 270 top
TP6  -  [TPAD_030]  101.66 25.98 270 top
TP7  -  [TPAD_030]  107.89 32.07 0 top
TP8  -  [TPAD_030]  104.84 28.01 180 top
TP9  -  [TPAD_030]  96.58 28.01 270 top
TP10  -  [TPAD_030]  99.88 28.01 270 top
TP11  -  [TPAD_030]  103.19 28.01 270 top
TP12  -  [TPAD_030]  101.54 28.01 0 top
TP13  -  [TPAD_030]  108.01 34.1 0 top
TP14  -  [TPAD_030]  95.44 31.56 0 top
TP15  -  [TPAD_030]  98.23 28.01 0 top
TP16  -  [TPAD_030]  95.44 35.5 180 top
TP17  -  [TPAD_030]  107.89 29.66 180 top
TP18  -  [TPAD_030]  95.44 33.47 0 top
TP19  -  [TPAD_030]  36.89 26.48 0 top
TP20  -  [TPAD_030]  34.99 26.48 0 top
TP21  -  [TPAD_030]  39.43 22.75 0 top
TP22  -  [TPAD_030]  29.02 26.48 0 top
TP23  -  [TPAD_030]  94.17 13.66 270 top
TP24  -  [TPAD_030]  96.07 13.66 270 top
TP25  -  [TPAD_030]  97.98 13.66 270 top
TP26  -  [TPAD_030]  100.01 13.66 270 top
TP27  -  [TPAD_030]  105.73 13.66 90 top
TP28  -  [TPAD_030]  31.05 45.41 0 top
TP29  -  [TPAD_030]  29.4 45.41 0 top
TP30  -  [TPAD_030]  32.83 45.43 0 top
TP31  -  [TPAD_030]  99.12 25.98 0 top
TP32  -  [TPAD_032]  81.44 21.48 0 top
TP33  -  [TPAD_032]  79.84 29.3 180 bottom
TP34  -  [TPAD_032]  13.14 10.74 180 bottom
TP36  -  [TPAD_032]  97.85 24.32 180 bottom
TP37  -  [TPAD_032]  105.91 33.28 180 bottom
TP38  -  [TPAD_032]  24.19 17.59 180 bottom
TP43  -  [TPAD_032]  10.3 40.94 180 bottom
TP44  -  [TPAD_032]  35.11 40.83 180 bottom
TP45  -  [TPAD_032]  25.64 30.83 180 bottom
TP46  -  [TPAD_032]  21.91 11.12 180 bottom
TP47  -  [TPAD_032]  20.08 13.17 180 bottom
U1  MCXN947VDFT  [BGA184_0P5_9X9_SM]  70.67 28.77 0 top
U2  XC6227C331PR-G  [SOT89-5]  49.34 11.5 270 top
U3  NX5P3090UK  [WLCSP12_0P4_1P38X1P68MM_SMDP]  50.35 18.1 0 top
U4  RClamp0854P.TCT  [SLP1616P6]  10.22 12.26 90 bottom
U5  PTN5150A  [X2QFN12_0P4_1P6X1P6]  24.07 13.78 0 top
U6  P3T1755DP  [TSSOP8_A]  102.3 23.05 0 top
U7  MT35XL512ABA1G12  [PBGA24_1_6X8MM]  102.04 33.6 0 top
U8  W25Q64JVSSIQ  [SO8_W]  102.04 33.6 180 top
U9  LAN8741A-EN  [QFN32EP]  34.48 21.66 90 top
U10  TJA1057GTK/3Z  [SON8_0P65_3P15X3P15]  48.83 25.09 180 top
U11  LPC55S69JEV98  [BGA98_0P5_7X7]  28.88 36.95 270 top
U12  RClamp0854P.TCT  [SLP1616P6]  10.1 43.76 90 bottom
Y1  24MHz  [XTAL4_2P1X1P7MM_SM]  59.88 31.18 270 top
Y2  32.768KHz  [XTAL2-3P2X1P5-SM]  75.63 18.74 180 top
Y3  50 MHz  [OSC4_3P2X2P5_SM]  33.34 13.28 0 top
Y4  16MHz  [XTAL4_3P4X2P7_SM]  21.01 40.76 270 top

## Library data of the parts
C1 C2 C4 C6 C10 C13 C17 C24-C27 C34 C36-C38 C40-C42 C44-C46 C48-C50 C54-C57 C60-C75 C83 C84 C87 C89 C90 C92 C93 C95-C97 C100-C105 = CAP_NP
C3 C5 C7-C9 C11 C12 C14-C16 C18-C20 C22 C23 C29-C32 C43 C47 C51-C53 C58 C76 C77 C79-C82 C85 C86 C88 C91 C94 C99 C106 C107 = CAP_NP: tolerance: 10%
C21 C28 C33 C35 = CAP_NP: tolerance: 10%; room: CPU
C39 C78 = CAP_NP: tolerance: 20%
D1 D5 D10-D12 = LED
D2 = LRTBR48G_4P
D3 D4 D6 = DIODE_SCHTKY
D7 D8 = DIODE_BIDIR
D9 = DIODE_NUP2105L
D14 D15 = DIODE_TVS
D16 = DIODE_ARRAY_5CH
D17 = DUALDIODE_CC_SOT23_SHTKY
E1 = ELECTRODE
J1 J3 = CONN_HDR_8X2
J2 = CONN_HDR_10X2
J4 J7 = CONN_HDR_6X2
J5 J6 = CONN_HDR_8X1
J8 = CONN_HDR_14X2
J9 = CONN_HDR_16X2
J10 = CONN_HDR_2X2
J11 J17 = USB16_TYPEC_4SH
J12 = CON_MICROSD_9P_4G
J15 = CONN_HDR_3X1
J16 = CON_RJ45_1X8_YG
J18 J19 J21 J22 J24-J28 JP6 = CONN_HDR_2X1
J23 = CONN_HDR_5X2
JP1 JP2 = CONN_HDR_1X1
L1 = INDUCTOR_FERRITE
L2 L9-L12 = INDUCTOR
L3 L6 = BEAD: tolerance: 25%
L5 = IND
L13 = DLW43
MH1-MH4 = MOUNT_HOLE
Q1 = 2SK3018
R1-R3 R21 R37 R38 R40 R42 R49 R50 R97 R106 R116 = RES: tolerance: 5%
R4-R7 R24 R58-R60 R66 R69 R108 R109 R114 = RES: tolerance: 1%
R8-R12 R14-R20 R22 R23 R25-R29 R32-R36 R39 R41 R43-R48 R51-R57 R61-R65 R67 R68 R72-R74 R76-R78 R82-R84 R86-R96 R98 R100-R103 R107 R110-R113 R117-R124 R129-R149 R151-R156 R166-R169 R171-R173 R178 R179 R188-R194 R198-R205 R207-R212 = RES
R70 R71 R75 R79-R81 = RES: signal model: RES_RC0402
R85 R160-R165 = RES: signal model: RES_RC0603_OV_DISCRETE_0.6MM_470-80866_0_0
SJ1-SJ27 = RES_3PIN_C
SW1-SW3 = SW_PSHBT_SPST_2
T1 = SM13072APEL_XFMR16P
TP1-TP34 TP36-TP38 TP43-TP47 = TESTLOOP
U1 = MCXN947VDFT_BGA_184P
U2 = XC6227C_5P
U3 = NX5P3090UK_WLCSP12
U4 U12 = RCLAMP1654P_NEW
U5 = PTN5150A_X2QFN12
U6 = P3T2175DP_TSSOP8
U7 = MT35XL512ABA1G12
U8 = W25Q64JV_SOIC_8P_B
U9 = LAN8710
U10 = TJA1051TK_3_HVSON8
U11 = NIOBE4_MINI_FBGA98
Y1 = XTAL_4PIN
Y2 = CRYSTAL
Y3 = OSC_ASFL
Y4 = XTAL_4P_B

## Footprints (pads in the part's own frame, mm; a bottom-side part is the same pattern mirrored in y, then rotated)
3PIN_0402X2_A
  custom 0.935x0.762 smd: 1(0.978,0) 3(-0.978,0)
  custom 0.889x0.762 smd: 2(0,0)
BGA98_0P5_7X7
  round 0.279 smd: A1(-3,3) A2(-2.5,3) A3(-2,3) A5(-1,3) A6(-0.5,3) A7(0,3) A8(0.5,3) A9(1,3) A11(2,3) A12(2.5,3) A13(3,3) B1(-3,2.5) B2(-2.5,2.5) B3(-2,2.5) B5(-1,2.5) B6(-0.5,2.5) B7(0,2.5) B8(0.5,2.5) B9(1,2.5) B11(2,2.5) B12(2.5,2.5) B13(3,2.5) C1(-3,2) C2(-2.5,2) C7(0,2) C12(2.5,2) C13(3,2) E1(-3,1) E2(-2.5,1) E5(-1,1) E6(-0.5,1) E7(0,1) E8(0.5,1) E9(1,1) E12(2.5,1) E13(3,1) F1(-3,0.5) F2(-2.5,0.5) F5(-1,0.5) F6(-0.5,0.5) F8(0.5,0.5) F9(1,0.5) F12(2.5,0.5) F13(3,0.5) G1(-3,0) G2(-2.5,0) G3(-2,0) G5(-1,0) G6(-0.5,0) G8(0.5,0) G9(1,0) G11(2,0) G12(2.5,0) G13(3,0) H1(-3,-0.5) H2(-2.5,-0.5) H5(-1,-0.5) H6(-0.5,-0.5) H8(0.5,-0.5) H9(1,-0.5) H12(2.5,-0.5) H13(3,-0.5) J1(-3,-1) J2(-2.5,-1) J5(-1,-1) J6(-0.5,-1) J7(0,-1) J8(0.5,-1) J9(1,-1) J12(2.5,-1) J13(3,-1) L1(-3,-2) L2(-2.5,-2) L7(0,-2) L12(2.5,-2) L13(3,-2) M1(-3,-2.5) M2(-2.5,-2.5) M3(-2,-2.5) M5(-1,-2.5) M6(-0.5,-2.5) M7(0,-2.5) M8(0.5,-2.5) M9(1,-2.5) M11(2,-2.5) M12(2.5,-2.5) M13(3,-2.5) N1(-3,-3) N2(-2.5,-3) N3(-2,-3) N5(-1,-3) N6(-0.5,-3) N7(0,-3) N8(0.5,-3) N9(1,-3) N11(2,-3) N12(2.5,-3) N13(3,-3)
BGA184_0P5_9X9_SM
  round 0.279 smd: A1(-4,4) A2(-3.5,4) A4(-2.5,4) A6(-1.5,4) A8(-0.5,4) A10(0.5,4) A12(1.5,4) A14(2.5,4) A16(3.5,4) A17(4,4) B1(-4,3.5) B2(-3.5,3.5) B3(-3,3.5) B4(-2.5,3.5) B6(-1.5,3.5) B7(-1,3.5) B8(-0.5,3.5) B10(0.5,3.5) B11(1,3.5) B12(1.5,3.5) B14(2.5,3.5) B15(3,3.5) B16(3.5,3.5) B17(4,3.5) C3(-3,3) C4(-2.5,3) C5(-2,3) C6(-1.5,3) C8(-0.5,3) C9(0,3) C10(0.5,3) C12(1.5,3) C13(2,3) C14(2.5,3) C15(3,3) D1(-4,2.5) D2(-3.5,2.5) D3(-3,2.5) D4(-2.5,2.5) D6(-1.5,2.5) D7(-1,2.5) D9(0,2.5) D11(1,2.5) D12(1.5,2.5) D14(2.5,2.5) D15(3,2.5) D16(3.5,2.5) D17(4,2.5) E4(-2.5,2) E5(-2,2) E7(-1,2) E8(-0.5,2) E10(0.5,2) E11(1,2) E13(2,2) E14(2.5,2) F1(-4,1.5) F2(-3.5,1.5) F3(-3,1.5) F4(-2.5,1.5) F6(-1.5,1.5) F8(-0.5,1.5) F10(0.5,1.5) F12(1.5,1.5) F14(2.5,1.5) F15(3,1.5) F16(3.5,1.5) F17(4,1.5) G2(-3.5,1) G4(-2.5,1) G5(-2,1) G7(-1,1) G11(1,1) G13(2,1) G14(2.5,1) G16(3.5,1) H1(-4,0.5) H2(-3.5,0.5) H3(-3,0.5) H5(-2,0.5) H6(-1.5,0.5) H8(-0.5,0.5) H9(0,0.5) H10(0.5,0.5) H12(1.5,0.5) H13(2,0.5) H15(3,0.5) H16(3.5,0.5) H17(4,0.5) J3(-3,0) J4(-2.5,0) J8(-0.5,0) J10(0.5,0) J14(2.5,0) J15(3,0) K1(-4,-0.5) K2(-3.5,-0.5) K3(-3,-0.5) K5(-2,-0.5) K6(-1.5,-0.5) K8(-0.5,-0.5) K9(0,-0.5) K10(0.5,-0.5) K12(1.5,-0.5) K13(2,-0.5) K15(3,-0.5) K16(3.5,-0.5) K17(4,-0.5) L2(-3.5,-1) L4(-2.5,-1) L5(-2,-1) L7(-1,-1) L11(1,-1) L13(2,-1) L14(2.5,-1) L16(3.5,-1) M1(-4,-1.5) M2(-3.5,-1.5) M3(-3,-1.5) M4(-2.5,-1.5) M6(-1.5,-1.5) M8(-0.5,-1.5) M10(0.5,-1.5) M12(1.5,-1.5) M14(2.5,-1.5) M15(3,-1.5) M16(3.5,-1.5) M17(4,-1.5) N4(-2.5,-2) N5(-2,-2) N7(-1,-2) N8(-0.5,-2) N10(0.5,-2) N11(1,-2) N13(2,-2) N14(2.5,-2) P1(-4,-2.5) P2(-3.5,-2.5) P3(-3,-2.5) P4(-2.5,-2.5) P6(-1.5,-2.5) P7(-1,-2.5) P9(0,-2.5) P11(1,-2.5) P12(1.5,-2.5) P14(2.5,-2.5) P15(3,-2.5) P16(3.5,-2.5) P17(4,-2.5) R3(-3,-3) R4(-2.5,-3) R5(-2,-3) R6(-1.5,-3) R8(-0.5,-3) R9(0,-3) R10(0.5,-3) R12(1.5,-3) R13(2,-3) R14(2.5,-3) R15(3,-3) T1(-4,-3.5) T2(-3.5,-3.5) T3(-3,-3.5) T4(-2.5,-3.5) T6(-1.5,-3.5) T7(-1,-3.5) T8(-0.5,-3.5) T10(0.5,-3.5) T11(1,-3.5) T12(1.5,-3.5) T14(2.5,-3.5) T15(3,-3.5) T16(3.5,-3.5) T17(4,-3.5) U1(-4,-4) U2(-3.5,-4) U4(-2.5,-4) U6(-1.5,-4) U8(-0.5,-4) U10(0.5,-4) U12(1.5,-4) U14(2.5,-4) U16(3.5,-4) U17(4,-4)
CC0402_25
  round 0.635 smd: 1(-0.508,0) 2(0.508,0)
CC0603_OV
  oval 0.889x1.143 smd: 1(-0.762,0) 2(0.762,0)
CC0805_OV
  oval 0.889x1.524 smd: 1(-0.965,0) 2(0.965,0)
CC1206_OV
  oval 1.016x1.778 smd: 1(-1.524,0) 2(1.524,0)
CON9_SDCARD_1P1_15P05X14P75_SM
  round 0 hole 0.94 unplated: (-3.875,-3.4) (2.925,-3.4)
  rect 0.61x1.397 smd: 1(2.105,8.025) 2(1.005,8.025) 3(-0.095,8.025) 4(-1.195,8.025) 5(-2.295,8.025) 6(-3.395,8.025) 7(-4.495,8.025) 8(-5.595,8.025) 9(-6.695,8.025)
  rect 1.092x2.388 smd: G1(-8.075,6.025) G2(8.075,6.025) G3(-8.075,-2.975) G4(8.075,-2.975)
CON12P_1P02_16P48X15P5_RA_TH
  round 1.194 hole 0.889: 1(0,0) 2(-1.02,1.1) 3(-2.04,0) 4(-3.06,1.1) 5(-4.08,0) 6(-5.1,1.1) 7(-6.12,0) 8(-7.14,1.1) 9(-10.63,-1.08) 10(-8.34,-1.08) 11(1.2,-1.08) 12(3.49,-1.08)
  oval 1.346x2.845 hole 0.711x2.21: S1(4.47,-6.4) S2(-11.61,-6.4)
CON16_USB_TYPE-C_RA_TH
  rect 0.66x0.66 hole 0.406: A1(0,0)
  round 0.66 hole 0.406: A4(0.85,0) A5(1.7,0) A6(2.55,0) A7(3.4,0) A8(4.25,0) A9(5.1,0) A12(5.95,0) B1(5.95,-1.35) B4(5.1,-1.35) B5(4.25,-1.35) B6(3.4,-1.35) B7(2.55,-1.35) B8(1.7,-1.35) B9(0.85,-1.35) B12(0,-1.35)
  oval 0.889x2.388 hole 0.61x2.108: SH1(-1.35,-0.98) SH2(7.3,-0.98)
  oval 0.889x1.702 hole 0.61x1.397: SH3(-1.35,-4.36) SH4(7.3,-4.36)
CON_1X8_SKT_2P54_TH_126L
  rect 1.702x1.702 hole 1.016: 1(0,0)
  round 1.702 hole 1.016: 2(0,-2.54) 3(0,-5.08) 4(0,-7.62) 5(0,-10.16) 6(0,-12.7) 7(0,-15.24) 8(0,-17.78)
CON_2X8_SKT_100_TH
  rect 1.651x1.651 hole 1.016: 1(0,0)
  round 1.651 hole 1.016: 2(0,-2.54) 3(2.54,0) 4(2.54,-2.54) 5(5.08,0) 6(5.08,-2.54) 7(7.62,0) 8(7.62,-2.54) 9(10.16,0) 10(10.16,-2.54) 11(12.7,0) 12(12.7,-2.54) 13(15.24,0) 14(15.24,-2.54) 15(17.78,0) 16(17.78,-2.54)
CON_SKT2X6_TH_126L
  rect 1.676x1.676 hole 1.041: 1(0,0)
  round 1.676 hole 1.041: 2(0,2.54) 3(-2.54,0) 4(-2.54,2.54) 5(-5.08,0) 6(-5.08,2.54) 7(-7.62,0) 8(-7.62,2.54) 9(-10.16,0) 10(-10.16,2.54) 11(-12.7,0) 12(-12.7,2.54)
CON_SKT2X10_TH
  rect 1.651x1.651 hole 1.016: 1(0,0)
  round 1.651 hole 1.016: 2(-2.54,0) 3(0,-2.54) 4(-2.54,-2.54) 5(0,-5.08) 6(-2.54,-5.08) 7(0,-7.62) 8(-2.54,-7.62) 9(0,-10.16) 10(-2.54,-10.16) 11(0,-12.7) 12(-2.54,-12.7) 13(0,-15.24) 14(-2.54,-15.24) 15(0,-17.78) 16(-2.54,-17.78) 17(0,-20.32) 18(-2.54,-20.32) 19(0,-22.86) 20(-2.54,-22.86)
CON_SKT2X14_TH_126L
  rect 1.549x1.549 hole 1.041: 1(0,0)
  round 1.549 hole 1.041: 2(-2.54,0) 3(0,-2.54) 4(-2.54,-2.54) 5(0,-5.08) 6(-2.54,-5.08) 7(0,-7.62) 8(-2.54,-7.62) 9(0,-10.16) 10(-2.54,-10.16) 11(0,-12.7) 12(-2.54,-12.7) 13(0,-15.24) 14(-2.54,-15.24) 15(0,-17.78) 16(-2.54,-17.78) 17(0,-20.32) 18(-2.54,-20.32) 19(0,-22.86) 20(-2.54,-22.86) 21(0,-25.4) 22(-2.54,-25.4) 23(0,-27.94) 24(-2.54,-27.94) 25(0,-30.48) 26(-2.54,-30.48) 27(0,-33.02) 28(-2.54,-33.02)
CON_SKT_32F_100_TH
  rect 1.524x1.524 hole 1.041: 1(0,0)
  round 1.524 hole 1.041: 2(-2.54,0) 3(0,-2.54) 4(-2.54,-2.54) 5(0,-5.08) 6(-2.54,-5.08) 7(0,-7.62) 8(-2.54,-7.62) 9(0,-10.16) 10(-2.54,-10.16) 11(0,-12.7) 12(-2.54,-12.7) 13(0,-15.24) 14(-2.54,-15.24) 15(0,-17.78) 16(-2.54,-17.78) 17(0,-20.32) 18(-2.54,-20.32) 19(0,-22.86) 20(-2.54,-22.86) 21(0,-25.4) 22(-2.54,-25.4) 23(0,-27.94) 24(-2.54,-27.94) 25(0,-30.48) 26(-2.54,-30.48) 27(0,-33.02) 28(-2.54,-33.02) 29(0,-35.56) 30(-2.54,-35.56) 31(0,-38.1) 32(-2.54,-38.1)
ELECTRODE_8MM_SQ_CIR
  custom 8x8 smd: 1(0,0)
HDR1X2_5P48X2P69
  rect 1.753x1.753 hole 1.118: 1(0,0)
  round 1.753 hole 1.118: 2(2.54,0)
HDR101
  rect 1.676x1.676 hole 1.016: 1(0,0)
HDR103
  rect 1.524x1.524 hole 1.016: 1(0,0)
  round 1.524 hole 1.016: 2(0,-2.54) 3(0,-5.08)
HDR202_100_TH
  rect 1.676x1.676 hole 1.016: 1(0,0)
  round 1.676 hole 1.016: 2(2.54,0) 3(0,-2.54) 4(2.54,-2.54)
HDR_5X2_FTSH_TH
  oval 1.422x1.016 hole 0.711: 1(0,0) 2(1.27,0) 3(0,-1.27) 4(1.27,-1.27) 5(0,-2.54) 6(1.27,-2.54) 7(0,-3.81) 8(1.27,-3.81) 9(0,-5.08) 10(1.27,-5.08)
IND4_CHOKE_0805_39H
  rect 0.914x0.406 smd: 1(-0.85,-0.4) 2(0.85,-0.4) 3(0.85,0.4) 4(-0.85,0.4)
IND_1P8X1MM_SM
  rect 0.991x0.711 smd: 1(-0.845,0) 2(0.845,0)
IND_0402
  round 0.635 smd: 1(-0.508,0) 2(0.508,0)
IND_0805
  rect 1.295x1.499 smd: 1(-0.978,0) 2(0.978,0)
IND_1608
  rect 0.61x0.813 smd: 1(-0.701,0) 2(0.701,0)
IND_SPH2520
  rect 1.219x2.007 smd: 1(-1.01,0) 2(1.01,0)
LED4_2P7X2P6_SM
  rect 0.66x0.66 smd: 1(-1.049,-0.65) 2(1.049,-0.65) 3(1.049,0.65) 4(-1.049,0.65)
LED_1P1_1P1X0P6_SM
  rect 0.61x0.61 smd: A(0.55,0) C(-0.55,0)
LED_1X0P6_SM
  rect 0.508x0.61 smd: A(0.45,0) C(-0.45,0)
MH125-160
  round 0 hole 3.175 unplated: (0,0)
OSC4_3P2X2P5_SM
  rect 1.397x1.194 smd: 1(-1.1,-0.95) 2(1.1,-0.95) 3(1.1,0.95) 4(-1.1,0.95)
PBGA24_1_6X8MM
  round 0.33 smd: A2(-1,2) A3(0,2) A4(1,2) A5(2,2) B1(-2,1) B2(-1,1) B3(0,1) B4(1,1) B5(2,1) C1(-2,0) C2(-1,0) C3(0,0) C4(1,0) C5(2,0) D1(-2,-1) D2(-1,-1) D3(0,-1) D4(1,-1) D5(2,-1) E1(-2,-2) E2(-1,-2) E3(0,-2) E4(1,-2) E5(2,-2)
QFN32EP
  oval 0.889x0.279 smd: 1(-2.49,1.751) 8(-2.49,-1.751) 17(2.49,-1.751) 24(2.49,1.751)
  rect 0.889x0.279 smd: 2(-2.49,1.251) 3(-2.49,0.751) 4(-2.49,0.25) 5(-2.49,-0.25) 6(-2.49,-0.751) 7(-2.49,-1.251) 18(2.49,-1.251) 19(2.49,-0.751) 20(2.49,-0.25) 21(2.49,0.25) 22(2.49,0.751) 23(2.49,1.251)
  oval 0.279x0.889 smd: 9(-1.751,-2.49) 16(1.751,-2.49) 25(1.751,2.49) 32(-1.751,2.49)
  rect 0.279x0.889 smd: 10(-1.251,-2.49) 11(-0.751,-2.49) 12(-0.25,-2.49) 13(0.25,-2.49) 14(0.751,-2.49) 15(1.251,-2.49) 26(1.251,2.49) 27(0.751,2.49) 28(0.25,2.49) 29(-0.25,2.49) 30(-0.751,2.49) 31(-1.251,2.49)
  rect 3.454x3.454 smd: 33(0,0)
RC0402_25
  round 0.635 smd: 1(-0.508,0) 2(0.508,0)
RC0603_OV
  oval 0.889x1.143 smd: 1(-0.762,0) 2(0.762,0)
RC0805_OV
  oval 0.889x1.524 smd: 1(-0.965,0) 2(0.965,0)
SKT2X6_100_TH_RA
  rect 1.651x1.651 hole 1.016: 1(0,0)
  round 1.651 hole 1.016: 2(2.54,0) 3(0,-2.54) 4(2.54,-2.54) 5(0,-5.08) 6(2.54,-5.08) 7(0,-7.62) 8(2.54,-7.62) 9(0,-10.16) 10(2.54,-10.16) 11(0,-12.7) 12(2.54,-12.7)
SLP1616P6
  rect 0.305x0.635 smd: 1(-0.5,-0.76) 2(0,-0.76) 3(0.5,-0.76) 4(0.5,0.76) 5(0,0.76) 6(-0.5,0.76)
  rect 1.295x0.457 smd: 7(0,0)
SMB_2P7X1P4
  rect 0.813x0.813 smd: A(1.25,0)
  rect 2.007x1.092 smd: C(-0.65,0)
SO8_W
  rect 2.032x0.635 smd: 1(-3.632,1.905) 2(-3.632,0.635) 3(-3.632,-0.635) 4(-3.632,-1.905) 5(3.632,-1.905) 6(3.632,-0.635) 7(3.632,0.635) 8(3.632,1.905)
SOD523
  rect 0.61x0.813 smd: A(0.85,0) C(-0.85,0)
SOD882
  rect 0.406x0.711 smd: 1(-0.35,0) 2(0.35,0)
SON8_0P65_3P15X3P15
  custom 0.85x0.35 smd: 1(-1.475,0.975) 2(-1.475,0.325) 3(-1.475,-0.325) 4(-1.475,-0.975) 5(1.475,-0.975) 6(1.475,-0.325) 7(1.475,0.325) 8(1.475,0.975)
  rect 1.6x2.413 smd: 9(0,0)
SOT23-40X40
  rect 1.016x1.016 smd: 1(-0.94,-1.003) 2(0.94,-1.003) 3(0,1.003)
SOT89-5
  rect 0.559x1.651 smd: 1(-1.501,-1.501) 3(1.501,-1.501)
  custom 1.748x4.648 smd: 2(0,0)
  rect 0.559x1.524 smd: 4(1.501,1.565) 5(-1.501,1.565)
SOT323_3
  rect 0.406x0.991 smd: 1(0.65,-1.06) 2(-0.65,-1.06) 3(0,1.06)
SOT-23
  rect 1.016x1.397 smd: 1(-0.95,-1.1) 2(0.95,-1.1) 3(0,1.1)
SOT-363_0P65_SMT
  rect 0.762x0.381 smd: 1(-1.085,0.65) 2(-1.085,0) 3(-1.085,-0.65) 4(1.085,-0.65) 5(1.085,0) 6(1.085,0.65)
SW4_4P15_4P2X3P2_SM
  rect 1.041x0.66 smd: 1(-2.015,1.075) 2(2.135,1.075) 3(-2.015,-1.075) 4(2.135,-1.075)
TPAD_030
  round 0.762 smd: 1(0,0)
TPAD_032
  round 0.813 smd: 1(0,0)
TSSOP8_A
  rect 1.448x0.457 smd: 1(-2.15,0.975) 2(-2.15,0.325) 3(-2.15,-0.325) 4(-2.15,-0.975) 5(2.15,-0.975) 6(2.15,-0.325) 7(2.15,0.325) 8(2.15,0.975)
unnamed#2
  round 1.524 smd: (0,0)
WLCSP12_0P4_1P38X1P68MM_SMDP
  round 0.254 smd: A1(-0.4,0.6) A2(0,0.6) A3(0.4,0.6) B1(-0.4,0.2) B2(0,0.2) B3(0.4,0.2) C1(-0.4,-0.2) C2(0,-0.2) C3(0.4,-0.2) D1(-0.4,-0.6) D2(0,-0.6) D3(0.4,-0.6)
X2QFN12_0P4_1P6X1P6
  rect 0.711x0.203 smd: 1(-0.606,0.2) 2(-0.606,-0.2) 7(0.606,-0.2) 8(0.606,0.2)
  rect 0.203x0.457 smd: 3(-0.6,-0.725) 4(-0.2,-0.725) 5(0.2,-0.725) 6(0.6,-0.725) 9(0.6,0.725) 10(0.2,0.725) 11(-0.2,0.725) 12(-0.6,0.725)
XFMR16_1P27_13P05X7P15
  rect 0.762x1.702 smd: 1(-4.445,-4.4) 2(-3.175,-4.4) 3(-1.905,-4.4) 4(-0.635,-4.4) 5(0.635,-4.4) 6(1.905,-4.4) 7(3.175,-4.4) 8(4.445,-4.4) 9(4.445,4.4) 10(3.175,4.4) 11(1.905,4.4) 12(0.635,4.4) 13(-0.635,4.4) 14(-1.905,4.4) 15(-3.175,4.4) 16(-4.445,4.4)
XTAL2-3P2X1P5-SM
  rect 1.092x1.905 smd: 1(-1.25,0) 2(1.25,0)
XTAL4_2P1X1P7MM_SM
  rect 0.864x0.762 smd: 1(-0.675,-0.525) 2(0.675,-0.525) 3(0.675,0.525) 4(-0.675,0.525)
XTAL4_3P4X2P7_SM
  rect 1.397x1.143 smd: 1(-1.1,-0.8) 2(1.1,-0.8) 3(1.1,0.8) 4(-1.1,0.8)

## Nets
AGND: C20.2 C25.2 C26.2 C69.2 R12.2 U1.R6
GND: C1.2 C2.2 C3.2 C4.2 C5.2 C6.2 C7.2 C8.2 C9.2 C10.2 C11.2 C12.2 C13.2 C14.2 C15.2 C16.2 C17.2 C18.2 C19.2 C21.2 C22.2 C23.2 C24.2 C27.2 C28.2 C29.2 C30.2 C31.2 C32.2 C33.2 C34.2 C35.2 C36.2 C37.2 C38.2 C39.2 C40.2 C41.2 C42.2 C43.2 C44.2 C45.2 C46.2 C47.2 C48.2 C49.2 C50.2 C51.2 C52.2 C53.2 C54.2 C55.2 C56.2 C57.2 C58.2 C60.2 C62.2 C63.2 C64.2 C65.2 C66.2 C67.2 C68.2 C70.2 C71.2 C72.2 C73.2 C74.2 C75.2 C76.2 C77.2 C78.2 C79.2 C80.2 C81.2 C82.2 C83.2 C84.2 C85.2 C86.2 C87.2 C88.2 C89.2 C90.2 C91.2 C92.2 C93.2 C94.2 C95.2 C96.2 C97.2 C99.2 C100.2 C101.2 C102.1 C103.1 C104.2 C105.2 C106.2 C107.2 D5.C(CATHODE) D7.1 D8.1 D9.3 D14.A D15.A D16.2 J2.14 J3.12 J3.14 J5.8 J6.8 J7.9 J7.10 J8.2 J9.22 J10.4(B2) J11.A1 J11.A12 J11.B1 J11.B12 J12.6(VSS) J12.G1 J12.G2 J12.G3 J12.G4 J15.2 J17.A1 J17.A12 J17.B1 J17.B12 J18.2 J19.2 J21.1 J23.3 J23.5 JP1.1 JP2.1 JP6.2 Q1.1(SOURCE) R12.1 R21.2 R29.2 R33.2 R49.2 R50.2 R54.2 R66.2 R67.2 R68.2 R69.2 R82.2 R87.2 R88.2 R89.2 R90.2 R95.1 R96.1 R103.2 R107.2 R112.2 R113.2 R117.2 R118.2 R119.2 R120.2 R121.2 R122.2 R123.2 R135.2 R147.2 R154.2 R192.1 R193.1 R205.2 R207.2 SW1.1 SW1.2 SW2.1 SW2.2 SW3.1 SW3.2 U1.D6 U1.D9 U1.D12 U1.E5 U1.E13 U1.G2 U1.H5 U1.H9 U1.H13 U1.J4 U1.J8 U1.J10 U1.J14 U1.K9 U1.N13 U1.P6 U1.P7 U1.P9(VSS_P4_3) U1.P12 U1.P14 U1.P16 U1.T16 U2.2(VSS) U3.B3 U3.C3 U3.D3 U4.7 U5.10 U6.4 U6.5 U6.6 U6.7 U7.B3 U7.C1 U7.E5(VSS3) U8.4 U9.33 U10.2 U10.9 U11.B1 U11.B5 U11.B9 U11.B13 U11.H1 U11.H2 U11.J13 U11.M11 U11.M12 U11.N1 U11.N5 U11.N12 U12.7 Y1.2 Y1.4(GND2) Y3.2 Y4.2 Y4.4
GND_ENET: C60.1 C61.2 J16.S1 J16.S2(SHIELD_2) R82.1
P3V3: C58.1 C70.1 C83.1 C104.1 C105.1 D2.1 J3.4 J3.8 J6.7 J7.11 J7.12(B6) J8.1 J9.21 J24.1 L5.1 L9.1 L10.1 L12.1 R1.1 R2.1 R3.1 R4.1 R24.1 R25.2 R26.1 R32.1 R108.1 R109.1 R114.1 R124.1 R140.1 R141.1 R144.1 R145.1 R146.1 R148.1 R149.1 R188.1 R190.2 R198.1 R200.1 R201.1 R202.1 R203.1 R204.1 R208.1 R209.1 R210.1 R211.1 Y3.4(VDD)
P3V3_I3C: C44.1 C45.1 R51.2 R52.2 R201.2 TP36.1(PIN1) U6.8(VCC)
P3V3_MCU: D17.1 J24.2 J25.1 J26.1 J28.1 R16.1 R151.1 R152.1
P3V3_PTN: C41.1 R36.1 R37.1 R38.1 R39.1 R40.1 R41.1 R42.1 R203.2 TP46.1(PIN1) U5.12(VDD)
P3V3_QSPI: C46.1 C47.1 R58.1 R59.1 R60.1 R200.2 TP37.1(PIN1) U7.B4 U7.D1 U7.E4 U8.8(VCC)
P3V3_SDHC: C42.1 C43.1 J12.4 R57.1 R202.2
P5V0: C33.1 C34.1 C37.1 C38.1 C71.1 D3.C D4.C D6.C J3.10 J5.7 J10.3 R199.1 U2.1 U2.4 U3.B1 U3.B2 U3.C1(VINT3)
P5V0_MCU_LINK_USB: J17.A4 J17.A9 J17.B4(VBUS4) J17.B9 L6.1 TP43.1(PIN1) U12.6(VBUS)
P5V_HDR_IN: C75.1 D6.A J15.3
P5V_MCU_LINK_USB: C78.1 D3.A L6.2 R106.1
P5V_USB_HS: C39.1 D4.A L3.2 R27.1 TP34.1(PIN1) U3.C2 U3.D1 U3.D2
VDD_ANA: C20.1 C69.1 J2.16 L1.2 R171.1 U1.R4
VDD_BAT: C31.1 J27.2 R15.2 U1.T17
VDD_CORE: C21.1 C22.1 C23.1 R18.2 R19.2 TP33.1(PIN1) U1.K10 U1.L11
VDD_CORE_SYS: J28.2 R14.1 R16.2 R20.1 R22.1
VDD_DCDC: C28.1 R14.2 R194.1 U1.R15
VDD_IO_USB: J25.2 R8.1 R9.1 R10.1 R11.1 R151.2 R212.1
VDD_LDO_CORE_IN: C30.1 R19.1 R20.2 U1.K6
VDD_LDO_SYS_IN: C32.1 R22.2 R23.1 U1.P15
VDD_P2: C10.1 C11.1 C12.1 R10.2 U1.K8 U1.L7
VDD_P3: C6.1 C7.1 C8.1 C9.1 R9.2 U1.G11 U1.H10 U1.H12
VDD_P4: C17.1 C18.1 C19.1 R8.2 U1.N5 U1.P4
VDD_SYS: C24.1 C107.1 R23.2 U1.N14
ADC0_A0/ARD_A0: J4.2 U1.P3
ADC0_B0/ARD_A1: J4.4 U1.R3
ADC1_B0/MC_BEMF_A: J2.1 U1.T3
ANA_4/ADC1_A0: J6.1 U1.T2
ANA_6/ADC0_A3: J3.2 U1.U2
CAN_H: C66.1 D9.1 J10.1 R98.1 R100.2
CAN_L: C68.1 D9.2(CATHODE2) J10.2 R101.2 R102.2
CANH: R100.1 U10.7
CANL: R101.1 U10.6
DBGIF_VREF: C106.1 R204.2 R205.1 U11.L1
DCDC_LX: L2.1 R17.1 U1.P17
DCDC_VDD_CORE: C27.1 L2.2 R18.1 TP32.1(PIN1)
ENET_CON_NC4: J16.4 R73.1
ENET_CON_NC5: J16.5 R78.1
ENET_CON_NC7: J16.7 R77.1
ENET_CON_NC8: J16.8 R76.1
ENET_CON_RXN: J16.6 T1.8
ENET_CON_RXP: J16.3 T1.6
ENET_CON_TXN: J16.2 T1.3
ENET_CON_TXP: J16.1 T1.1
ENET_CT1: R72.1 T1.2
ENET_CT2: R74.1 T1.7
ENET_CT3&4: C99.1 R153.2 T1.10 T1.15
ENET_LED1/REGOFF: J16.9 R95.2 U9.3
ENET_LED2/INTSEL_B: J16.11 R96.2 R207.1 U9.2
ENET_MDC: R191.2 U9.17
ENET_PHYAD0: R70.1 R91.2
ENET_PHYAD1: R93.2 U9.7
ENET_PHYAD2: R92.2 U9.8
ENET_RMIISEL: R94.2 U9.9
ENET_RXN: C57.1 R65.2 T1.9 U9.30
ENET_RXP: C56.1 R64.2 T1.11 U9.31
ENET_TXN: C55.1 R63.2 T1.14(TX-) U9.28
ENET_TXP: C54.1 R62.2 T1.16 U9.29
EPHY_VDDA: C50.1 C51.1 C52.1 L5.2 R62.1 R63.1 R64.1 R65.1 R153.1 TP38.1(PIN1) U9.1 U9.27
EPHY_VDDCR_1V2: C48.1 C49.1 U9.6
EPHY_VDDIO: C53.1 R86.1 R91.1 R92.1 R93.1 R94.1 R155.1 R190.1 U9.12
EXTAL: C2.1 U1.F2 Y1.3
EXTAL32K: C100.1 U1.U16 Y2.2
HS_USB_CC1: D8.2(C2) J11.A5 R48.1
HS_USB_CC2: D7.2(C2) J11.B5 R47.1
HS_USB_DN: J11.A7 J11.B7 L13.1 U4.1
HS_USB_DP: J11.A6 J11.B6 L13.4 U4.2
HS_USB_ID: Q1.2 R44.2 U1.P11
LDO_3V3: C35.1 C36.1 R25.1 U2.5
LPC_DBGIF_DETECT: R134.1 U11.E9
LPC_DBGIF_ISP0_CTRL: R133.1 U11.C13
LPC_DBGIF_RESET: R132.1 U11.E6
LPC_DBGIF_TCK_SWCLK: J22.1 U11.L12
LPC_DBGIF_TDI: R131.1 U11.F5
LPC_DBGIF_TDO_SWO: R130.1 U11.F8
LPC_DBGIF_TMS_SWDIO: R129.1 U11.B11
LPC_HW_VER_0: R118.1 U11.E8
LPC_HW_VER_1: R119.1 U11.A8
LPC_HW_VER_2: R121.1 U11.F9
